# Altium PCB Octo-Electrode.PcbDoc (part 1 of 6)
Units mm, origin at the board's own origin, x right, y up, seen from the top; angles counter-clockwise.
Board outline 202.91 x 135.89 mm, 2 copper layers (Top Layer, Bottom Layer); 289 components, 165 nets, 790 pads, 510 vias.
Unrouted connection lines stored in the file: 83.
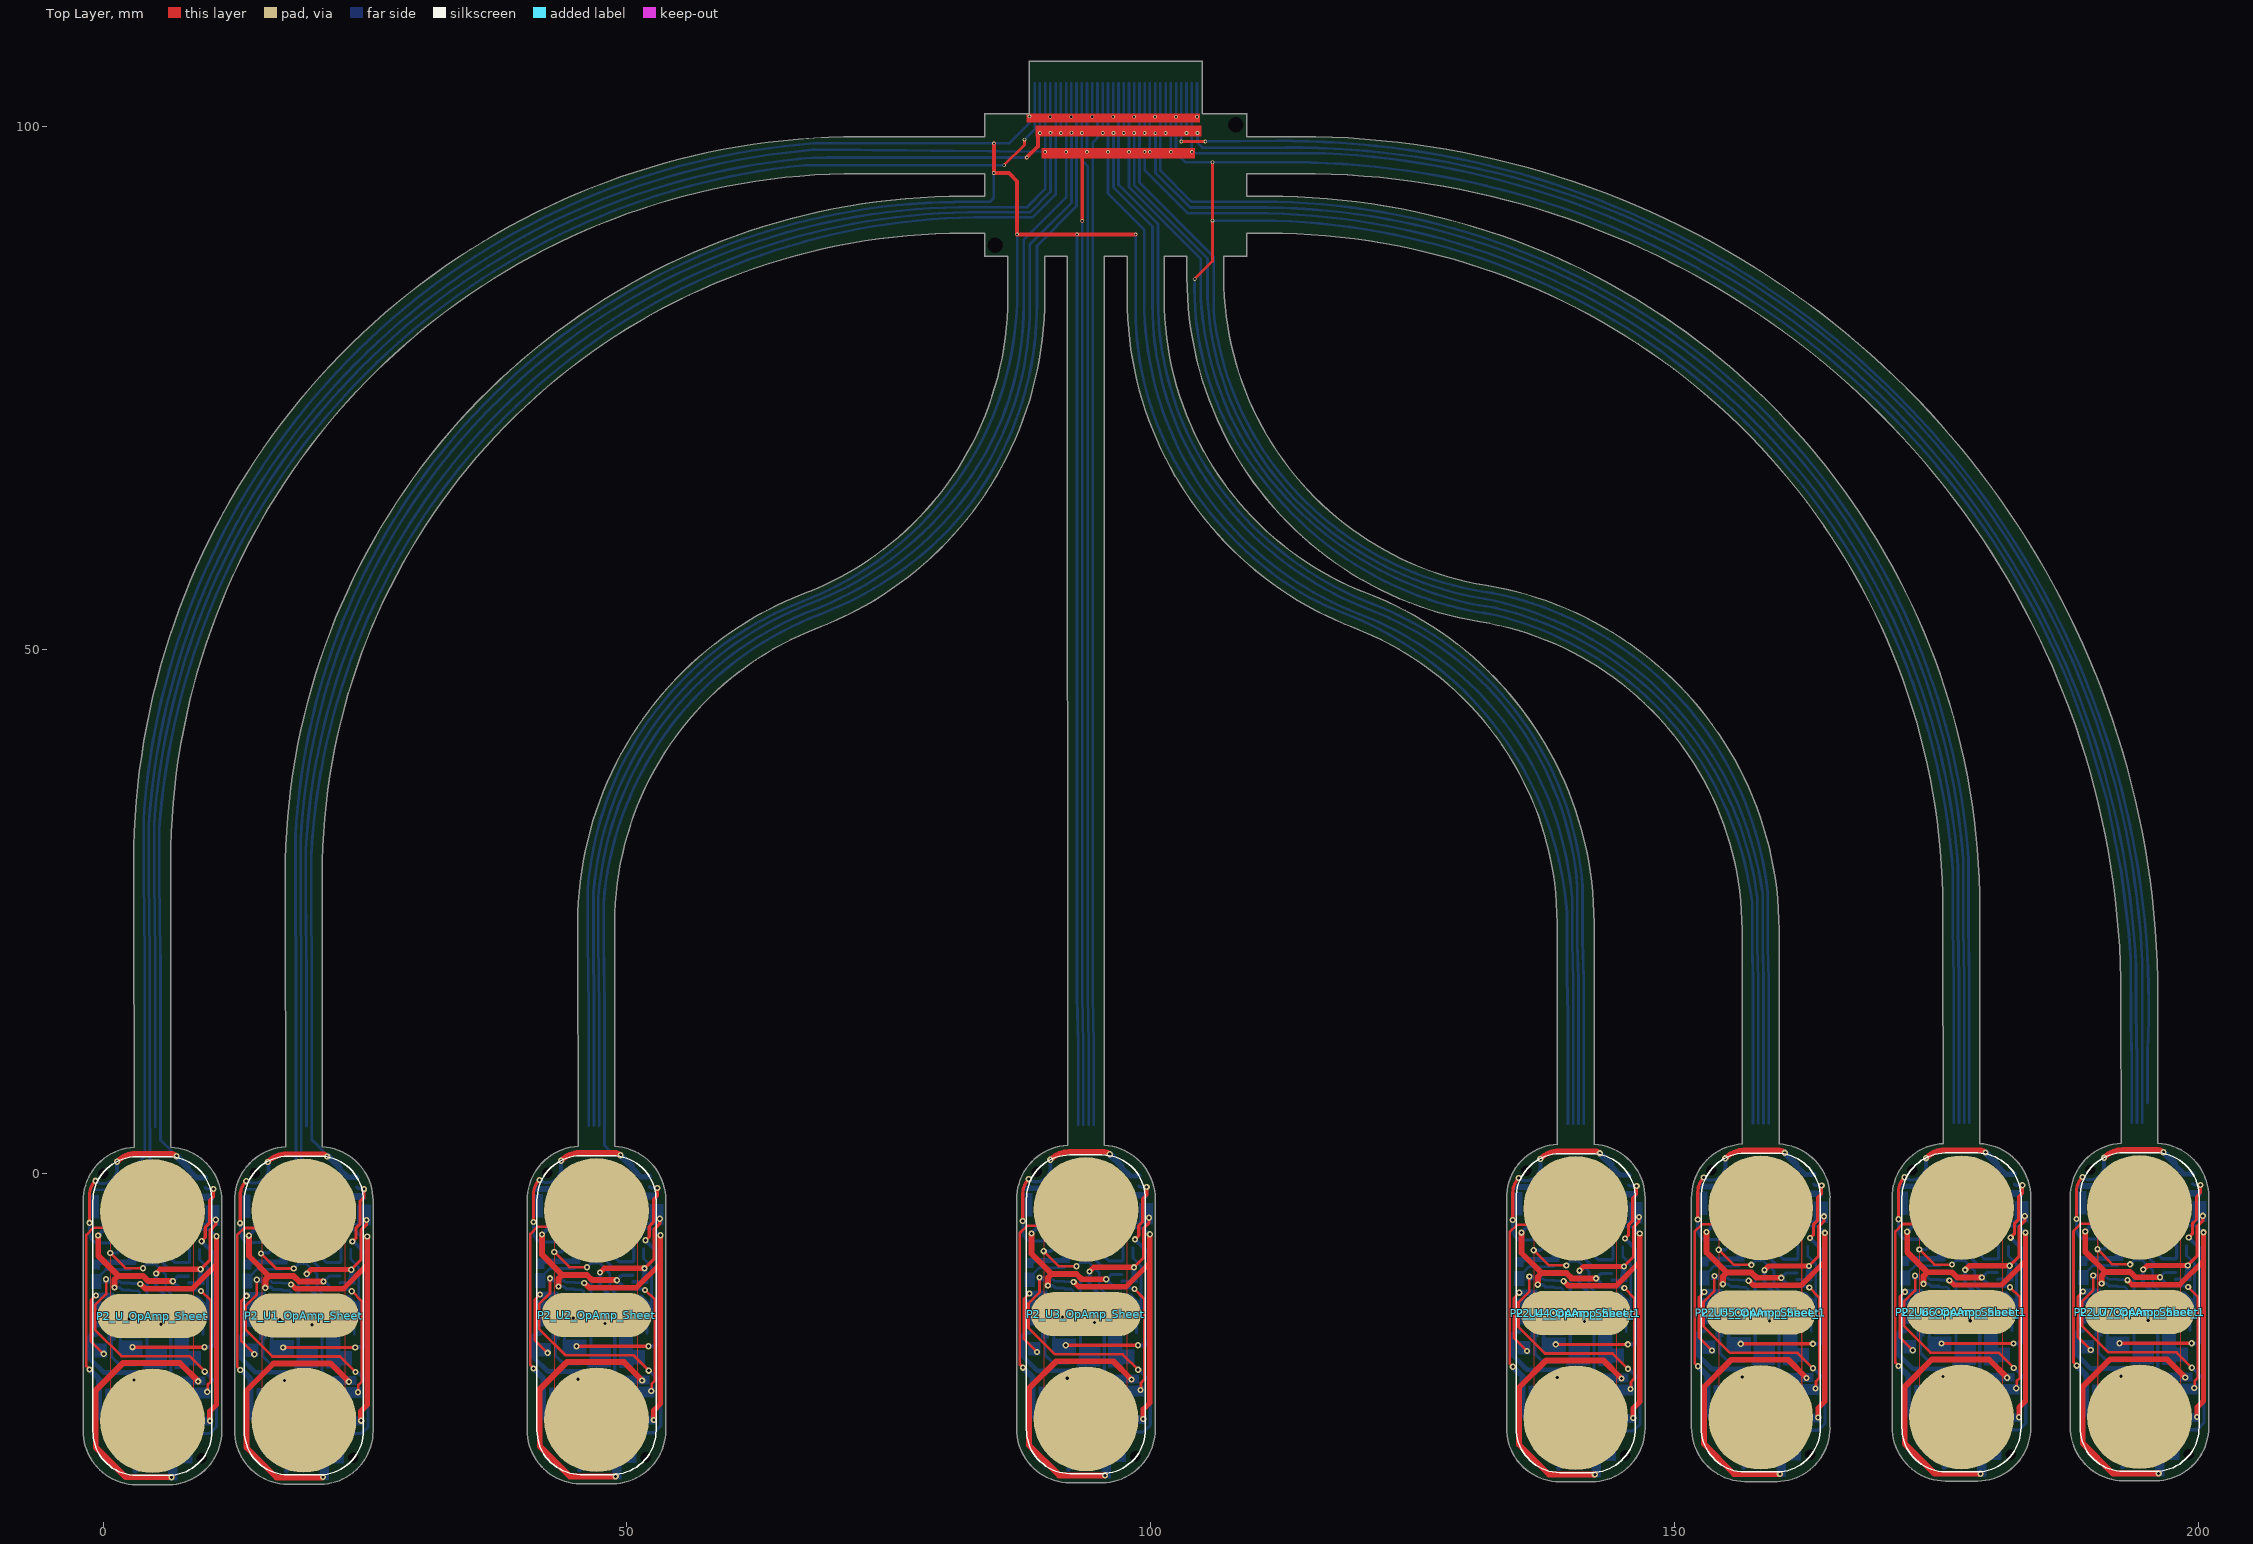
[diagram p0: Top Layer view]
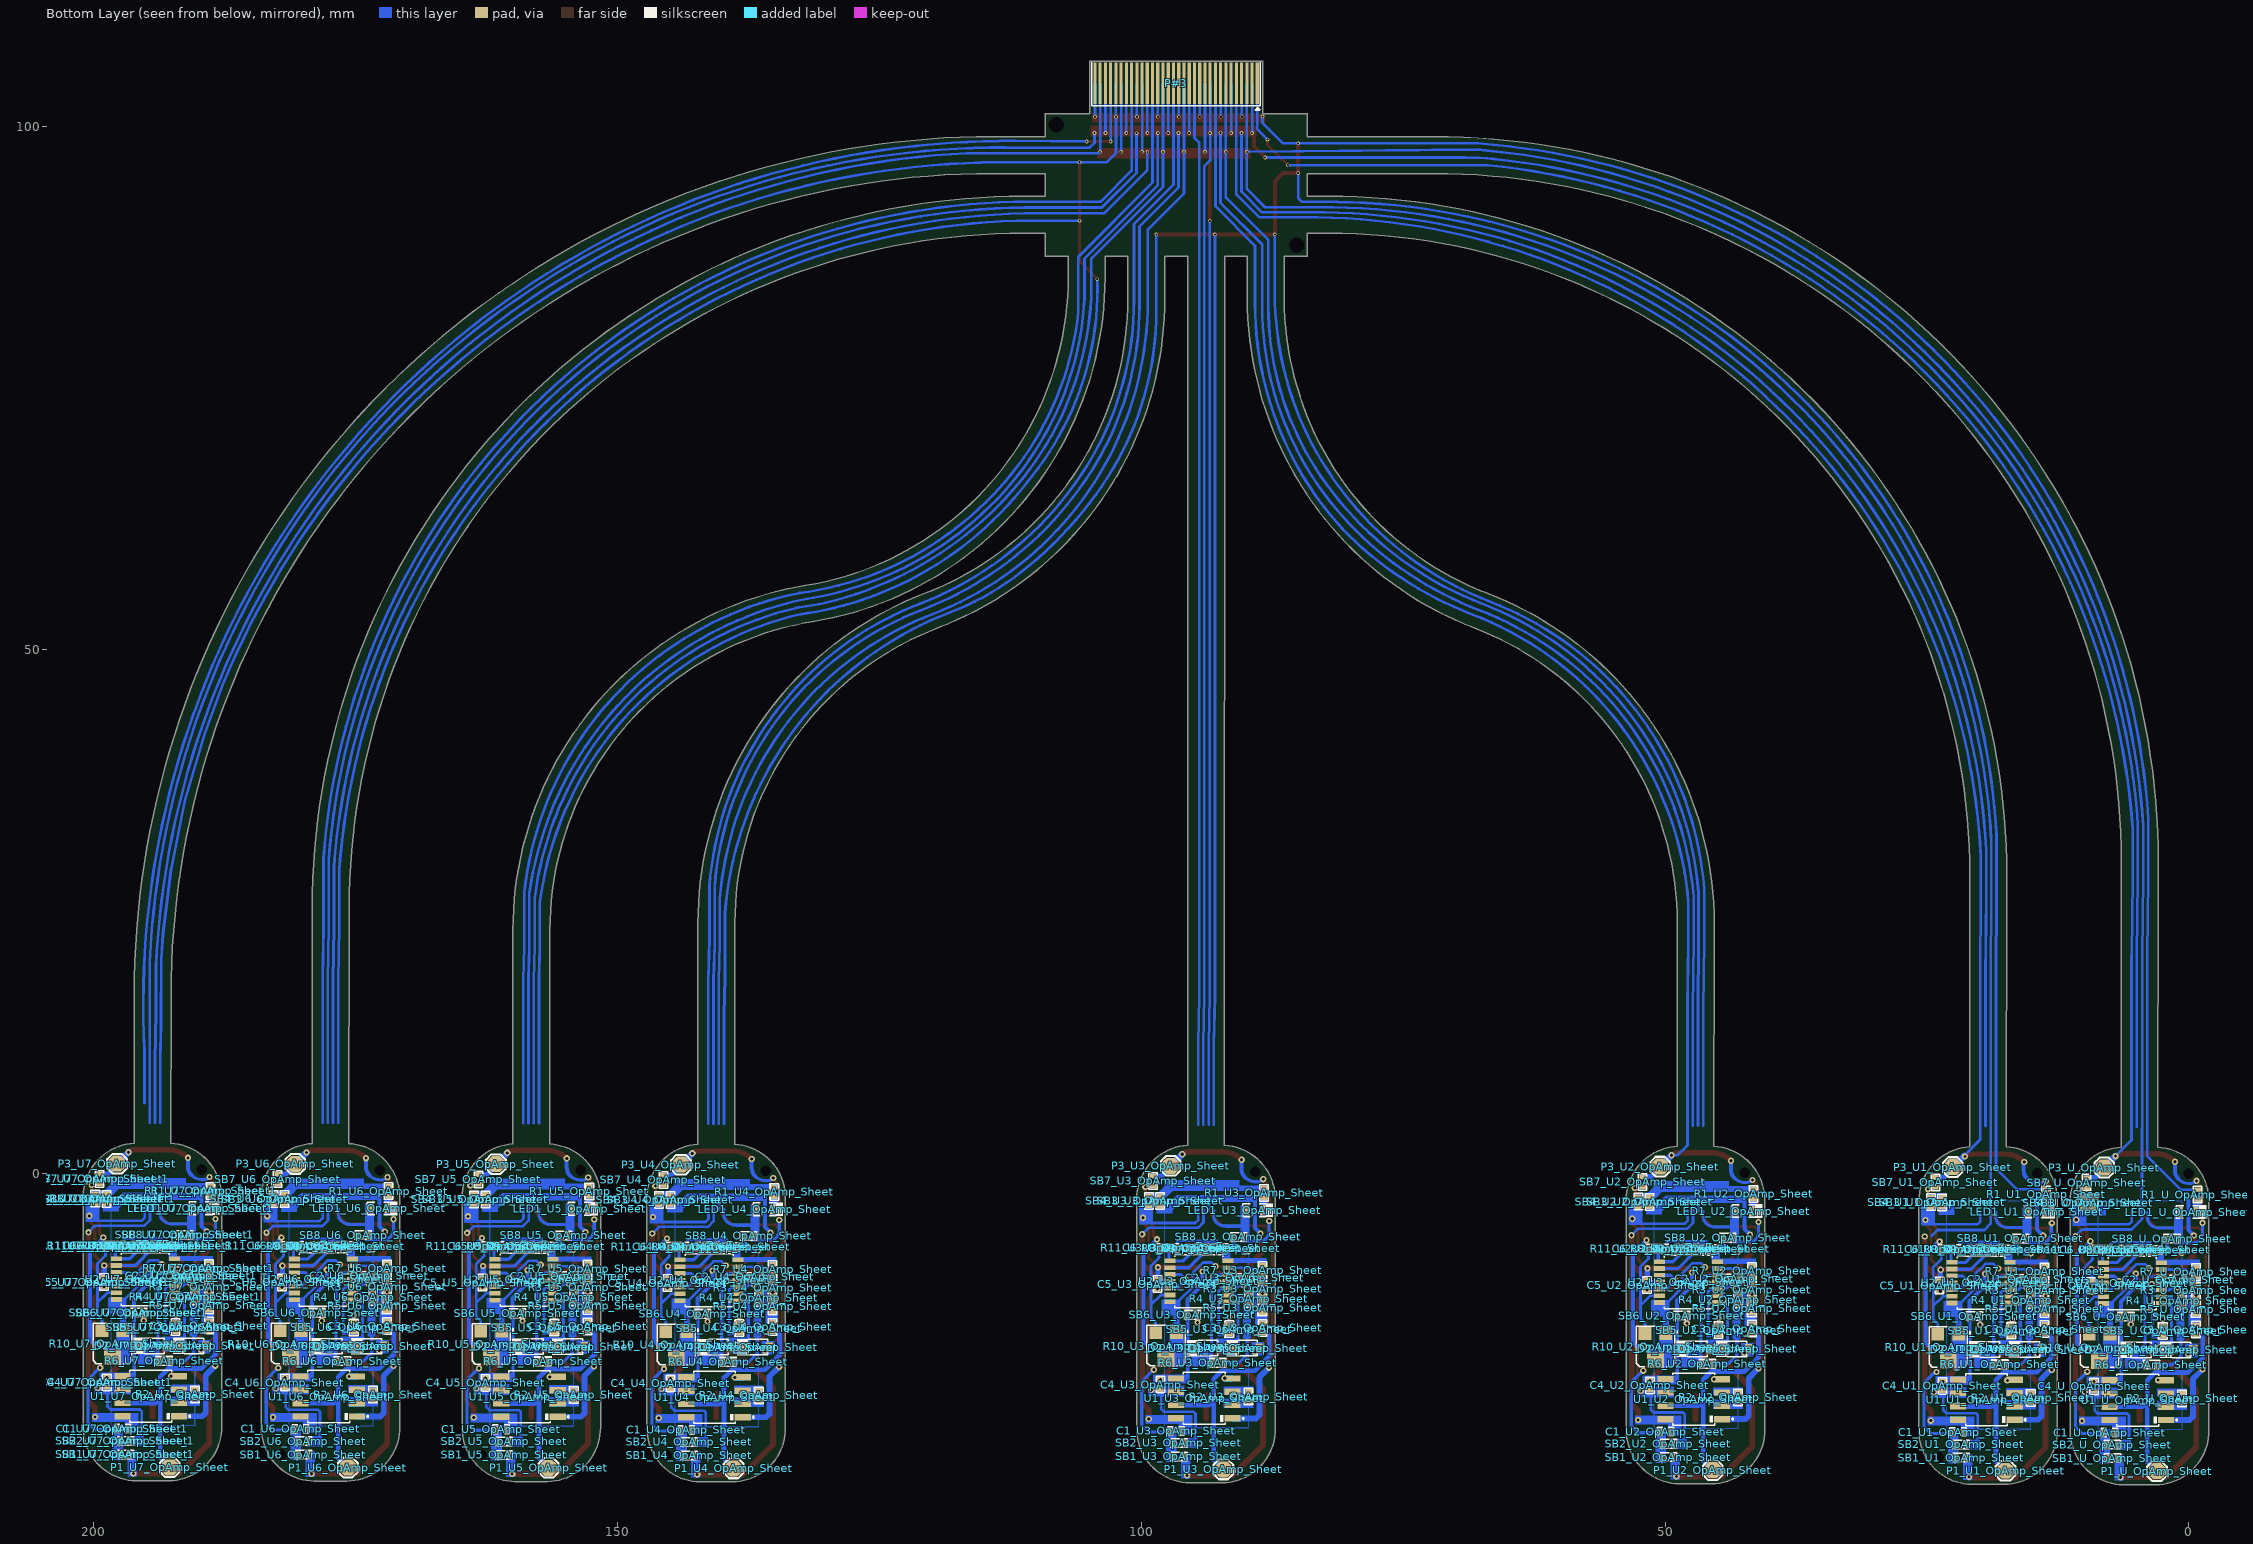
[diagram p1: Bottom Layer view, seen from below]
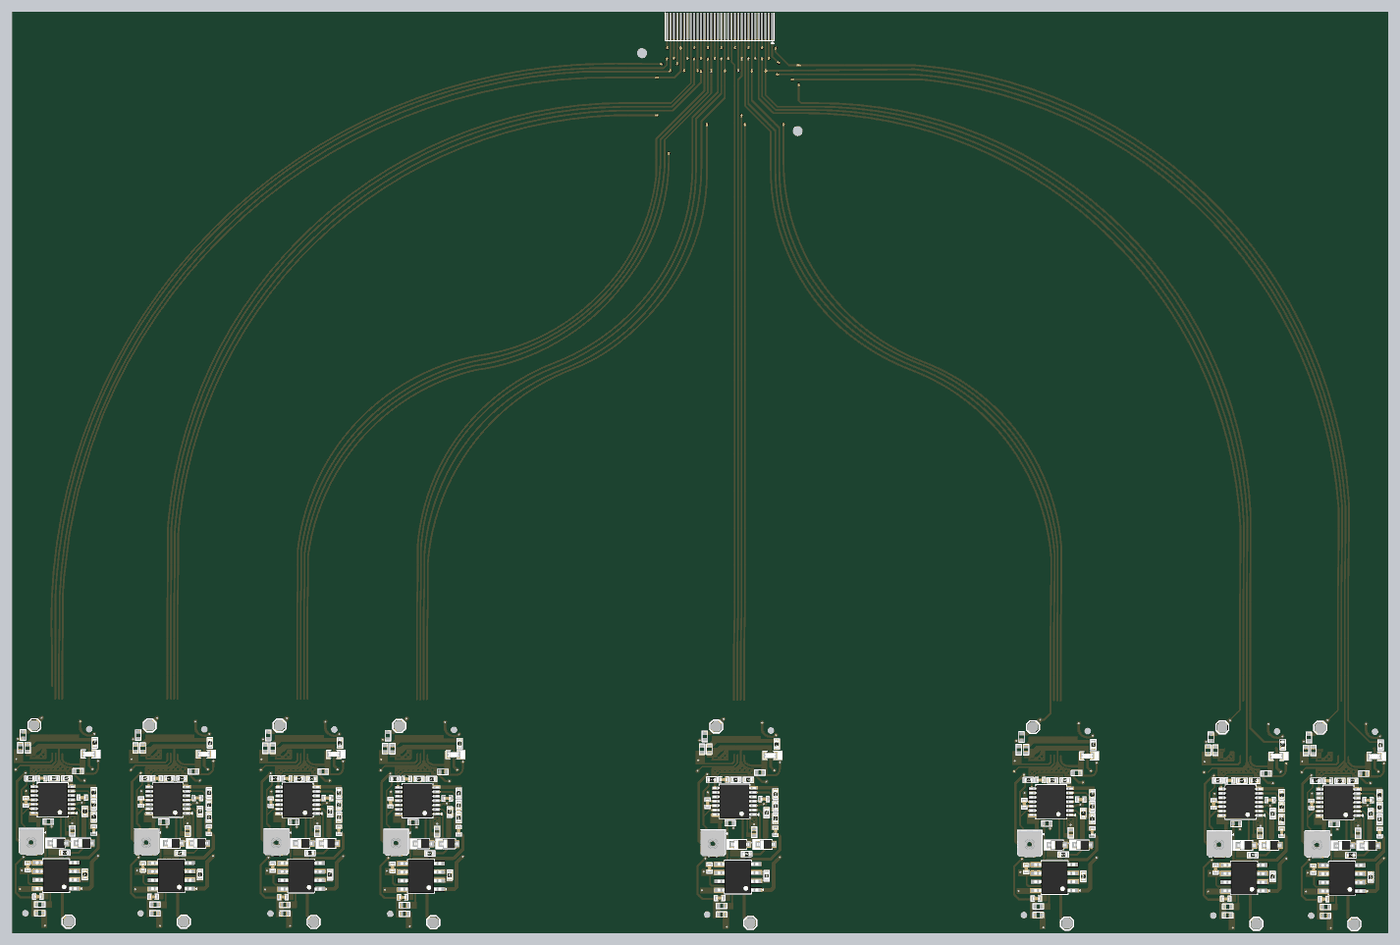
[diagram p6: 3D render of the assembled board from below, using the file's embedded part models]

## Layer stack, top to bottom
Top Solder: solder mask 0.0102, Solder Resist, Dk 3.5
Top Layer: signal copper 0.0356
Dielectric 1: dielectric 0.32, FR-4, Dk 4.8
Bottom Layer: signal copper 0.0356
Bottom Solder: solder mask 0.0102, Solder Resist, Dk 3.5

## Board outline
3.164,-29.694 ccw(c3.166,-29.575) 3.166,-29.694 6.245,-29.694 ccw(c6.245,-29.567) 6.246,-29.694 ccw(c6.189,-24.567) 11.316,-24.567 ccw(c6.189,-24.567) 11.316,-24.51 ccw(c4.059,-24.591) 11.316,-24.51 11.316,-24.511 11.316,-2.649 ccw(c6.188,-2.592) 11.316,-2.592 ccw(c6.189,-2.592) 6.445,2.529 6.445,29.757 cw(c72.162,29.758) 72.163,95.475 84.15,95.475 84.15,93.302 82.163,93.302 ccw(c82.163,28.514) 17.375,28.514 17.414,2.557 ccw(c17.674,-2.563) 12.547,-2.62 ccw(c12.623,-2.62) 12.547,-2.621 12.547,-2.62 12.547,-24.482 cw(c19.804,-24.562) 12.547,-24.481 12.547,-24.482 ccw(c17.674,-24.538) 17.616,-29.665 ccw(c17.618,-29.545) 17.618,-29.665 20.697,-29.665 ccw(c20.697,-29.538) 20.699,-29.665 ccw(c20.641,-24.538) 25.768,-24.538 ccw(c20.641,-24.538) 25.768,-24.482 ccw(c25.765,-24.481) 25.768,-24.481 25.768,-24.482 25.768,-2.62 ccw(c20.641,-2.563) 25.768,-2.563 ccw(c20.641,-2.563) 20.901,2.557 20.901,28.513 cw(c82.162,28.514) 82.163,89.775 84.15,89.775 84.157,87.582 ccw(c84.163,87.582) 84.163,87.575 86.35,87.575 86.35,83.589 cw(c56.158,83.59) 66.962,55.397 ccw(c79.027,23.912) 45.31,23.912 45.347,2.613 ccw(c45.608,-2.508) 40.481,-2.564 ccw(c40.558,-2.564) 40.481,-2.565 40.481,-2.564 40.481,-24.426 ccw(c45.608,-24.483) 45.55,-29.61 ccw(c45.552,-29.49) 45.552,-29.61 48.631,-29.61 ccw(c48.631,-29.482) 48.633,-29.61 ccw(c48.575,-24.483) 53.702,-24.483 ccw(c48.575,-24.483) 53.702,-24.426 ccw(c53.7,-24.425) 53.702,-24.425 53.702,-24.426 53.702,-2.564 ccw(c48.575,-2.508) 53.702,-2.508 ccw(c48.575,-2.508) 48.836,2.613 48.836,23.912 cw(c79.028,23.911) 68.224,52.104 ccw(c56.159,83.588) 89.876,83.588 ccw(c89.876,83.589) 89.876,83.589 89.876,87.575 92.05,87.575 92.057,2.706 ccw(c92.333,-2.414) 87.206,-2.471 ccw(c87.283,-2.471) 87.206,-2.472 87.206,-2.47 87.206,-24.332 cw(c94.463,-24.413) 87.206,-24.332 ccw(c92.333,-24.389) 92.275,-29.516 ccw(c92.277,-29.396) 92.277,-29.516 95.356,-29.516 ccw(c95.356,-29.389) 95.358,-29.516 ccw(c95.3,-24.389) 100.427,-24.389 ccw(c95.3,-24.389) 100.427,-24.332 ccw(c100.424,-24.332) 100.427,-24.332 100.427,-24.333 100.427,-2.471 ccw(c95.3,-2.414) 100.427,-2.414 ccw(c95.3,-2.414) 95.576,2.706 95.576,87.575 97.75,87.575 97.75,83.589 ccw(c131.467,83.588) 119.402,52.104 cw(c108.598,23.911) 138.79,23.912 138.827,2.8 ccw(c139.088,-2.321) 133.961,-2.378 ccw(c134.038,-2.377) 133.961,-2.379 133.961,-2.377 133.961,-24.239 cw(c141.218,-24.32) 133.961,-24.238 133.961,-24.239 ccw(c139.088,-24.296) 139.03,-29.423 ccw(c139.032,-29.303) 139.032,-29.423 142.111,-29.423 ccw(c142.111,-29.296) 142.113,-29.423 ccw(c142.055,-24.296) 147.182,-24.296 ccw(c142.055,-24.296) 147.182,-24.239 ccw(c147.179,-24.239) 147.182,-24.238 147.182,-24.24 147.182,-2.378 ccw(c142.055,-2.321) 147.182,-2.321 ccw(c142.055,-2.321) 142.316,2.8 142.316,23.912 ccw(c142.316,23.912) 142.316,23.912 ccw(c108.599,23.912) 120.664,55.397 cw(c131.468,83.59) 101.276,83.589 101.276,87.575 103.45,87.575 103.45,85.589 ccw(c136.785,85.588) 131.429,52.685 cw(c126.64,23.263) 156.45,23.263 cw(c156.449,23.262) 156.45,23.262 156.485,2.835 ccw(c156.747,-2.286) 151.62,-2.343 ccw(c151.697,-2.342) 151.62,-2.343 151.62,-2.342 151.62,-24.204 cw(c158.877,-24.284) 151.62,-24.203 151.62,-24.204 ccw(c156.747,-24.261) 156.69,-29.388 ccw(c156.691,-29.268) 156.691,-29.388 159.771,-29.388 ccw(c159.771,-29.26) 159.772,-29.388 ccw(c159.714,-24.261) 164.842,-24.261 ccw(c159.714,-24.261) 164.841,-24.204 ccw(c164.839,-24.204) 164.841,-24.203 164.841,-24.205 164.841,-2.343 ccw(c159.714,-2.286) 164.842,-2.286 ccw(c159.714,-2.286) 159.976,2.835 159.976,23.262 ccw(c159.971,23.262) 159.976,23.263 ccw(c126.64,23.263) 131.996,56.166 cw(c136.788,85.59) 106.976,85.589 106.976,87.575 109.169,87.582 ccw(c109.169,87.589) 109.176,87.589 109.176,89.775 111.163,89.775 cw(c111.163,25.33) 175.608,25.33 175.647,2.873 ccw(c175.908,-2.247) 170.781,-2.304 ccw(c170.857,-2.304) 170.781,-2.305 170.781,-2.304 170.781,-24.166 cw(c178.037,-24.246) 170.781,-24.165 170.781,-24.166 ccw(c175.908,-24.222) 175.85,-29.35 ccw(c175.852,-29.229) 175.851,-29.35 178.931,-29.35 ccw(c178.931,-29.222) 178.932,-29.35 ccw(c178.875,-24.222) 184.002,-24.222 ccw(c178.875,-24.222) 184.002,-24.166 ccw(c183.999,-24.165) 184.002,-24.165 184.002,-24.166 184.002,-2.304 ccw(c178.874,-2.247) 184.002,-2.247 ccw(c178.875,-2.247) 179.135,2.873 179.135,25.33 ccw(c111.163,25.33) 111.163,93.302 109.176,93.302 109.176,95.475 114.163,95.475 cw(c114.162,17.023) 192.614,17.025 192.638,2.907 ccw(c192.906,-2.214) 187.779,-2.27 ccw(c187.856,-2.27) 187.779,-2.271 187.779,-2.27 187.779,-24.132 cw(c195.036,-24.212) 187.779,-24.131 187.779,-24.132 ccw(c192.906,-24.189) 192.849,-29.316 ccw(c192.85,-29.195) 192.85,-29.316 195.93,-29.316 ccw(c195.93,-29.188) 195.931,-29.316 ccw(c195.873,-24.189) 201.001,-24.189 ccw(c195.873,-24.189) 201,-24.132 ccw(c200.998,-24.131) 201,-24.131 201,-24.132 201,-2.27 ccw(c195.873,-2.214) 201.001,-2.214 ccw(c195.873,-2.214) 196.141,2.907 196.141,17.025 ccw(c114.164,17.025) 114.163,99.002 109.176,99.002 109.17,101.195 ccw(c109.163,101.195) 109.163,101.202 104.921,101.202 104.921,106.187 ccw(c104.914,106.189) 104.921,106.189 ccw(c104.914,106.189) 104.914,106.196 88.411,106.196 ccw(c88.411,106.189) 88.405,106.187 88.405,101.202 87.956,101.202 84.156,101.196 ccw(c84.156,101.189) 84.15,101.189 84.15,99.002 72.163,99.002 ccw(c72.163,29.756) 2.918,29.757 2.965,2.529 ccw(c3.222,-2.592) -1.905,-2.649 ccw(c-1.829,-2.649) -1.905,-2.65 -1.905,-2.648 -1.905,-24.51 cw(c5.352,-24.591) -1.905,-24.51 ccw(c3.222,-24.567)
board region Electrode#8: 6.445,2.539 6.445,2.529 6.77,2.512 7.411,2.398 8.032,2.204 8.623,1.932 9.175,1.588 9.68,1.177 10.128,0.706 10.513,0.182 10.829,-0.387 11.071,-0.992 11.234,-1.621 11.316,-2.267 11.316,-2.592 11.316,-2.614 11.316,-2.628 11.316,-2.642 11.316,-24.511 11.316,-24.532 11.316,-24.546 11.316,-24.56 11.316,-24.901 11.23,-25.563 11.058,-26.207 10.805,-26.825 10.473,-27.404 10.069,-27.935 9.6,-28.41 9.073,-28.819 8.498,-29.157 7.884,-29.418 7.241,-29.597 6.58,-29.691 6.246,-29.694 3.166,-29.694 2.828,-29.691 2.163,-29.595 1.516,-29.414 0.898,-29.15 0.319,-28.807 -0.209,-28.392 -0.679,-27.912 -1.082,-27.374 -1.412,-26.788 -1.662,-26.165 -1.829,-25.514 -1.909,-24.846 -1.905,-24.51 -1.905,-2.648 -1.909,-2.321 -1.833,-1.67 -1.674,-1.034 -1.436,-0.424 -1.122,0.151 -0.737,0.682 -0.288,1.16 0.218,1.576 0.773,1.924 1.368,2.199 1.993,2.396 2.638,2.512 2.965,2.529 2.965,2.539
board region Electrode#6: 48.836,2.615 48.836,2.613 49.161,2.597 49.801,2.482 50.421,2.287 51.012,2.015 51.564,1.671 52.068,1.26 52.516,0.789 52.901,0.265 53.216,-0.304 53.457,-0.908 53.62,-1.537 53.703,-2.182 53.703,-2.508 53.702,-2.529 53.702,-2.543 53.702,-2.557 53.702,-24.426 53.702,-24.447 53.702,-24.461 53.703,-24.476 53.703,-24.816 53.616,-25.478 53.445,-26.123 53.191,-26.74 52.859,-27.319 52.456,-27.851 51.986,-28.325 51.46,-28.735 50.884,-29.073 50.27,-29.333 49.627,-29.512 48.966,-29.606 48.633,-29.61 45.552,-29.61 45.214,-29.606 44.549,-29.511 43.902,-29.329 43.284,-29.065 42.706,-28.723 42.177,-28.308 41.707,-27.827 41.304,-27.29 40.975,-26.704 40.724,-26.08 40.558,-25.429 40.477,-24.762 40.481,-24.426 40.481,-2.564 40.477,-2.237 40.554,-1.586 40.712,-0.951 40.95,-0.34 41.263,0.235 41.647,0.765 42.096,1.242 42.602,1.659 43.156,2.007 43.751,2.283 44.375,2.48 45.02,2.596 45.347,2.613 45.347,2.615
board region Electrod#7: 20.901,2.564 20.901,2.557 21.226,2.541 21.866,2.426 22.487,2.231 23.077,1.96 23.629,1.616 24.133,1.205 24.581,0.733 24.966,0.209 25.282,-0.36 25.523,-0.963 25.686,-1.593 25.768,-2.238 25.768,-2.563 25.768,-2.585 25.768,-2.599 25.768,-2.613 25.768,-24.482 25.768,-24.503 25.768,-24.517 25.768,-24.531 25.768,-24.872 25.682,-25.534 25.51,-26.179 25.257,-26.796 24.925,-27.375 24.521,-27.906 24.052,-28.381 23.526,-28.791 22.95,-29.128 22.336,-29.389 21.693,-29.568 21.032,-29.662 20.699,-29.665 17.618,-29.665 17.28,-29.662 16.615,-29.566 15.968,-29.385 15.35,-29.121 14.772,-28.779 14.243,-28.364 13.773,-27.883 13.37,-27.345 13.04,-26.76 12.79,-26.136 12.623,-25.485 12.543,-24.818 12.547,-24.482 12.547,-2.62 12.543,-2.293 12.619,-1.642 12.778,-1.006 13.016,-0.396 13.329,0.179 13.714,0.71 14.162,1.187 14.668,1.603 15.223,1.952 15.817,2.227 16.442,2.425 17.086,2.541 17.414,2.557 17.414,2.564
board region Electrode#5: 95.576,2.716 95.576,2.706 95.9,2.688 96.539,2.572 97.157,2.376 97.746,2.103 98.296,1.759 98.799,1.348 99.245,0.877 99.629,0.353 99.943,-0.215 100.183,-0.818 100.345,-1.446 100.427,-2.09 100.427,-2.414 100.427,-2.436 100.427,-2.45 100.427,-2.464 100.427,-24.333 100.427,-24.354 100.427,-24.368 100.427,-24.382 100.427,-24.723 100.341,-25.385 100.169,-26.03 99.916,-26.647 99.584,-27.226 99.18,-27.757 98.711,-28.232 98.184,-28.641 97.609,-28.979 96.995,-29.24 96.352,-29.419 95.691,-29.513 95.358,-29.516 92.277,-29.516 91.939,-29.513 91.274,-29.417 90.627,-29.236 90.009,-28.972 89.431,-28.63 88.902,-28.214 88.432,-27.734 88.029,-27.196 87.699,-26.611 87.449,-25.987 87.282,-25.336 87.202,-24.668 87.206,-24.332 87.206,-2.47 87.202,-2.144 87.278,-1.495 87.436,-0.86 87.673,-0.251 87.985,0.323 88.368,0.853 88.815,1.33 89.319,1.747 89.872,2.096 90.464,2.372 91.087,2.57 91.73,2.688 92.057,2.706 92.057,2.716
board region Electrode#2: 179.222,2.869 179.46,2.857 180.1,2.742 180.72,2.547 181.311,2.276 181.863,1.932 182.367,1.521 182.815,1.049 183.2,0.525 183.516,-0.044 183.757,-0.648 183.92,-1.277 184.002,-1.922 184.002,-2.247 184.002,-2.269 184.002,-2.283 184.002,-2.297 184.002,-24.166 184.002,-24.187 184.002,-24.201 184.002,-24.215 184.002,-24.556 183.916,-25.218 183.744,-25.863 183.49,-26.48 183.159,-27.059 182.755,-27.59 182.286,-28.065 181.759,-28.475 181.184,-28.813 180.569,-29.073 179.927,-29.252 179.266,-29.346 178.932,-29.35 175.851,-29.35 175.514,-29.346 174.849,-29.251 174.202,-29.069 173.584,-28.805 173.005,-28.463 172.477,-28.048 172.007,-27.567 171.604,-27.029 171.274,-26.444 171.024,-25.82 170.857,-25.169 170.777,-24.502 170.781,-24.166 170.781,-2.304 170.777,-1.977 170.853,-1.326 171.011,-0.691 171.249,-0.08 171.563,0.495 171.947,1.025 172.396,1.503 172.902,1.919 173.456,2.268 174.051,2.543 174.675,2.74 175.32,2.857 175.56,2.869
board region Electrode#4: 142.452,2.793 142.641,2.783 143.281,2.668 143.901,2.473 144.492,2.202 145.044,1.858 145.548,1.447 145.996,0.975 146.381,0.451 146.696,-0.117 146.937,-0.721 147.1,-1.351 147.182,-1.996 147.182,-2.321 147.182,-2.342 147.182,-2.356 147.182,-2.371 147.182,-24.24 147.182,-24.26 147.182,-24.275 147.182,-24.289 147.182,-24.63 147.096,-25.291 146.924,-25.936 146.671,-26.553 146.339,-27.133 145.935,-27.664 145.466,-28.138 144.94,-28.548 144.364,-28.886 143.75,-29.147 143.107,-29.325 142.446,-29.419 142.113,-29.423 139.032,-29.423 138.694,-29.419 138.029,-29.324 137.382,-29.143 136.764,-28.879 136.186,-28.536 135.657,-28.121 135.187,-27.641 134.784,-27.103 134.454,-26.517 134.204,-25.893 134.037,-25.242 133.957,-24.575 133.961,-24.239 133.961,-2.377 133.957,-2.05 134.033,-1.4 134.192,-0.764 134.429,-0.154 134.743,0.421 135.127,0.952 135.576,1.429 136.081,1.845 136.636,2.194 137.23,2.469 137.855,2.667 138.499,2.783 138.684,2.792
board region Electrode#3: 159.976,2.843 159.976,2.835 160.301,2.818 160.941,2.703 161.561,2.509 162.152,2.237 162.704,1.893 163.207,1.482 163.655,1.01 164.04,0.486 164.356,-0.082 164.597,-0.686 164.76,-1.316 164.842,-1.961 164.842,-2.286 164.842,-2.307 164.842,-2.321 164.842,-2.335 164.841,-24.205 164.842,-24.225 164.842,-24.239 164.842,-24.254 164.842,-24.594 164.755,-25.256 164.584,-25.901 164.33,-26.518 163.999,-27.097 163.595,-27.629 163.126,-28.103 162.599,-28.513 162.024,-28.851 161.409,-29.111 160.766,-29.29 160.106,-29.384 159.772,-29.388 156.691,-29.388 156.354,-29.384 155.688,-29.289 155.041,-29.108 154.423,-28.843 153.845,-28.501 153.316,-28.086 152.847,-27.605 152.443,-27.068 152.114,-26.482 151.864,-25.858 151.697,-25.207 151.617,-24.54 151.62,-24.204 151.62,-2.342 151.617,-2.015 151.693,-1.365 151.851,-0.729 152.089,-0.119 152.402,0.456 152.787,0.987 153.235,1.464 153.741,1.88 154.295,2.229 154.889,2.504 155.514,2.702 156.158,2.818 156.485,2.835 156.485,2.843
board region "Octopus Cable": 724 vertices, not listed, extent 2.918,2.539 196.141,106.196
board region Electrode#1: 196.141,2.922 196.141,2.907 196.466,2.89 197.105,2.774 197.725,2.579 198.315,2.307 198.866,1.963 199.369,1.552 199.816,1.081 200.2,0.557 200.515,-0.012 200.756,-0.615 200.919,-1.244 201.001,-1.889 201.001,-2.214 201.001,-2.235 201.001,-2.249 201.001,-2.263 201,-24.132 201.001,-24.153 201.001,-24.167 201.001,-24.181 201.001,-24.522 200.914,-25.184 200.743,-25.829 200.489,-26.446 200.158,-27.025 199.754,-27.556 199.285,-28.031 198.758,-28.441 198.183,-28.779 197.568,-29.039 196.925,-29.218 196.265,-29.312 195.931,-29.316 192.85,-29.316 192.513,-29.312 191.847,-29.217 191.2,-29.035 190.582,-28.771 190.004,-28.429 189.475,-28.014 189.006,-27.533 188.602,-26.995 188.273,-26.41 188.023,-25.786 187.856,-25.135 187.776,-24.468 187.779,-24.132 187.779,-2.27 187.776,-1.943 187.852,-1.293 188.01,-0.658 188.247,-0.048 188.56,0.527 188.944,1.057 189.392,1.534 189.897,1.95 190.45,2.299 191.044,2.575 191.668,2.773 192.312,2.89 192.388,2.894

## Design rules (kind name [scope] priority, off if disabled: settings)
Clearance [All] p1: gap=0.254 ignorepadtopadclearanceinfootprint=FALSE except(0: Arc-Hole Track-Hole SMDPad-Hole THPad-Hole Via-Hole Fill-Hole Poly-Hole Region-Hole Text-Hole)
DiffPairsRouting [All] p1: maxlimit=0.254 minlimit=0.254 mostfreqgap=0.254 toplayer_minwidth=0.381 toplayer_maxwidth=0.381 toplayer_prefwidth=0.381 bottomlayer_minwidth=0.381 bottomlayer_maxwidth=0.381 bottomlayer_prefwidth=0.381 substack1={5F1B2639-0814-40D6-A899-AA88A4E8CB33} toplayer_{5f1b2639-0814-40d6-a899-aa88a4e8cb33}_minwidth=0.381 toplayer_{5f1b2639-0814-40d6-a899-aa88a4e8cb33}_maxwidth=0.381 toplayer_{5f1b2639-0814-40d6-a899-aa88a4e8cb33}_prefwidth=0.381 bottomlayer_{5f1b2639-0814-40d6-a899-aa88a4e8cb33}_minwidth=0.381 bottomlayer_{5f1b2639-0814-40d6-a899-aa88a4e8cb33}_maxwidth=0.381 bottomlayer_{5f1b2639-0814-40d6-a899-aa88a4e8cb33}_prefwidth=0.381 maxuncoupledlength=12.7
PolygonConnect [All] p1: connectstyle=Relief reliefconductorwidth=0.254 reliefentries=4 polygonreliefangle="90 Angle" airgapwidth=0.254
RoutingVias [All] p1: holewidth=0.711 width=1.27 viastyle="Through Hole" minholewidth=0.711 minwidth=1.27 maxholewidth=0.711 maxwidth=1.27
SolderMaskExpansion [All] p1: expansion=0.102 istentingtop=FALSE
Width [All] p1: maxlimit=0.254 minlimit=0.254 preferedwidth=0.254 substack1={5F1B2639-0814-40D6-A899-AA88A4E8CB33}
29 further rules are at their usual default settings.

## Classes and differential pairs
channel class OpAmp_Sheet: U1_OpAmp_Sheet U2_OpAmp_Sheet U3_OpAmp_Sheet U4_OpAmp_Sheet U5_OpAmp_Sheet U6_OpAmp_Sheet U7_OpAmp_Sheet U_OpAmp_Sheet
component class U_OpAmp_Sheet: C1_U_OpAmp_Sheet C2_U_OpAmp_Sheet C3_U_OpAmp_Sheet C4_U_OpAmp_Sheet C5_U_OpAmp_Sheet C6_U_OpAmp_Sheet D1_U_OpAmp_Sheet D2_U_OpAmp_Sheet LED1_U_OpAmp_Sheet P1_U_OpAmp_Sheet P2_U_OpAmp_Sheet P3_U_OpAmp_Sheet R1_U_OpAmp_Sheet R2_U_OpAmp_Sheet R3_U_OpAmp_Sheet R4_U_OpAmp_Sheet R5_U_OpAmp_Sheet R6_U_OpAmp_Sheet R7_U_OpAmp_Sheet R8_U_OpAmp_Sheet R9_U_OpAmp_Sheet R10_U_OpAmp_Sheet R11_U_OpAmp_Sheet SB1_U_OpAmp_Sheet SB2_U_OpAmp_Sheet SB3_U_OpAmp_Sheet SB4_U_OpAmp_Sheet SB5_U_OpAmp_Sheet SB6_U_OpAmp_Sheet SB7_U_OpAmp_Sheet SB8_U_OpAmp_Sheet U1_U_OpAmp_Sheet U2_U_OpAmp_Sheet
component class U7_OpAmp_Sheet: C1_U7_OpAmp_Sheet C2_U7_OpAmp_Sheet C3_U7_OpAmp_Sheet C4_U7_OpAmp_Sheet C5_U7_OpAmp_Sheet C6_U7_OpAmp_Sheet D1_U7_OpAmp_Sheet D2_U7_OpAmp_Sheet LED1_U7_OpAmp_Sheet P1_U7_OpAmp_Sheet P2_U7_OpAmp_Sheet R1_U7_OpAmp_Sheet R2_U7_OpAmp_Sheet R3_U7_OpAmp_Sheet R4_U7_OpAmp_Sheet R5_U7_OpAmp_Sheet R6_U7_OpAmp_Sheet R7_U7_OpAmp_Sheet R8_U7_OpAmp_Sheet R9_U7_OpAmp_Sheet R10_U7_OpAmp_Sheet R11_U7_OpAmp_Sheet SB1_U7_OpAmp_Sheet SB2_U7_OpAmp_Sheet SB3_U7_OpAmp_Sheet SB4_U7_OpAmp_Sheet SB5_U7_OpAmp_Sheet SB6_U7_OpAmp_Sheet SB7_U7_OpAmp_Sheet SB8_U7_OpAmp_Sheet U1_U7_OpAmp_Sheet U2_U7_OpAmp_Sheet
component class U6_OpAmp_Sheet: C1_U6_OpAmp_Sheet C2_U6_OpAmp_Sheet C3_U6_OpAmp_Sheet C4_U6_OpAmp_Sheet C5_U6_OpAmp_Sheet C6_U6_OpAmp_Sheet D1_U6_OpAmp_Sheet D2_U6_OpAmp_Sheet LED1_U6_OpAmp_Sheet P1_U6_OpAmp_Sheet P2_U6_OpAmp_Sheet P3_U6_OpAmp_Sheet R1_U6_OpAmp_Sheet R2_U6_OpAmp_Sheet R3_U6_OpAmp_Sheet R4_U6_OpAmp_Sheet R5_U6_OpAmp_Sheet R6_U6_OpAmp_Sheet R7_U6_OpAmp_Sheet R8_U6_OpAmp_Sheet R9_U6_OpAmp_Sheet R10_U6_OpAmp_Sheet R11_U6_OpAmp_Sheet SB1_U6_OpAmp_Sheet SB2_U6_OpAmp_Sheet SB3_U6_OpAmp_Sheet SB4_U6_OpAmp_Sheet SB5_U6_OpAmp_Sheet SB6_U6_OpAmp_Sheet SB7_U6_OpAmp_Sheet SB8_U6_OpAmp_Sheet U1_U6_OpAmp_Sheet U2_U6_OpAmp_Sheet
component class U5_OpAmp_Sheet: C1_U5_OpAmp_Sheet C2_U5_OpAmp_Sheet C3_U5_OpAmp_Sheet C4_U5_OpAmp_Sheet C5_U5_OpAmp_Sheet C6_U5_OpAmp_Sheet D1_U5_OpAmp_Sheet D2_U5_OpAmp_Sheet LED1_U5_OpAmp_Sheet P1_U5_OpAmp_Sheet P2_U5_OpAmp_Sheet P3_U5_OpAmp_Sheet R1_U5_OpAmp_Sheet R2_U5_OpAmp_Sheet R3_U5_OpAmp_Sheet R4_U5_OpAmp_Sheet R5_U5_OpAmp_Sheet R6_U5_OpAmp_Sheet R7_U5_OpAmp_Sheet R8_U5_OpAmp_Sheet R9_U5_OpAmp_Sheet R10_U5_OpAmp_Sheet R11_U5_OpAmp_Sheet SB1_U5_OpAmp_Sheet SB2_U5_OpAmp_Sheet SB3_U5_OpAmp_Sheet SB4_U5_OpAmp_Sheet SB5_U5_OpAmp_Sheet SB6_U5_OpAmp_Sheet SB7_U5_OpAmp_Sheet SB8_U5_OpAmp_Sheet U1_U5_OpAmp_Sheet U2_U5_OpAmp_Sheet
component class U4_OpAmp_Sheet: C1_U4_OpAmp_Sheet C2_U4_OpAmp_Sheet C3_U4_OpAmp_Sheet C4_U4_OpAmp_Sheet C5_U4_OpAmp_Sheet C6_U4_OpAmp_Sheet D1_U4_OpAmp_Sheet D2_U4_OpAmp_Sheet LED1_U4_OpAmp_Sheet P1_U4_OpAmp_Sheet P2_U4_OpAmp_Sheet P3_U4_OpAmp_Sheet R1_U4_OpAmp_Sheet R2_U4_OpAmp_Sheet R3_U4_OpAmp_Sheet R4_U4_OpAmp_Sheet R5_U4_OpAmp_Sheet R6_U4_OpAmp_Sheet R7_U4_OpAmp_Sheet R8_U4_OpAmp_Sheet R9_U4_OpAmp_Sheet R10_U4_OpAmp_Sheet R11_U4_OpAmp_Sheet SB1_U4_OpAmp_Sheet SB2_U4_OpAmp_Sheet SB3_U4_OpAmp_Sheet SB4_U4_OpAmp_Sheet SB5_U4_OpAmp_Sheet SB6_U4_OpAmp_Sheet SB7_U4_OpAmp_Sheet SB8_U4_OpAmp_Sheet U1_U4_OpAmp_Sheet U2_U4_OpAmp_Sheet
component class U3_OpAmp_Sheet: C1_U3_OpAmp_Sheet C2_U3_OpAmp_Sheet C3_U3_OpAmp_Sheet C4_U3_OpAmp_Sheet C5_U3_OpAmp_Sheet C6_U3_OpAmp_Sheet D1_U3_OpAmp_Sheet D2_U3_OpAmp_Sheet LED1_U3_OpAmp_Sheet P1_U3_OpAmp_Sheet P2_U3_OpAmp_Sheet P3_U3_OpAmp_Sheet R1_U3_OpAmp_Sheet R2_U3_OpAmp_Sheet R3_U3_OpAmp_Sheet R4_U3_OpAmp_Sheet R5_U3_OpAmp_Sheet R6_U3_OpAmp_Sheet R7_U3_OpAmp_Sheet R8_U3_OpAmp_Sheet R9_U3_OpAmp_Sheet R10_U3_OpAmp_Sheet R11_U3_OpAmp_Sheet SB1_U3_OpAmp_Sheet SB2_U3_OpAmp_Sheet SB3_U3_OpAmp_Sheet SB4_U3_OpAmp_Sheet SB5_U3_OpAmp_Sheet SB6_U3_OpAmp_Sheet SB7_U3_OpAmp_Sheet SB8_U3_OpAmp_Sheet U1_U3_OpAmp_Sheet U2_U3_OpAmp_Sheet
component class U2_OpAmp_Sheet: C1_U2_OpAmp_Sheet C2_U2_OpAmp_Sheet C3_U2_OpAmp_Sheet C4_U2_OpAmp_Sheet C5_U2_OpAmp_Sheet C6_U2_OpAmp_Sheet D1_U2_OpAmp_Sheet D2_U2_OpAmp_Sheet LED1_U2_OpAmp_Sheet P1_U2_OpAmp_Sheet P2_U2_OpAmp_Sheet P3_U2_OpAmp_Sheet R1_U2_OpAmp_Sheet R2_U2_OpAmp_Sheet R3_U2_OpAmp_Sheet R4_U2_OpAmp_Sheet R5_U2_OpAmp_Sheet R6_U2_OpAmp_Sheet R7_U2_OpAmp_Sheet R8_U2_OpAmp_Sheet R9_U2_OpAmp_Sheet R10_U2_OpAmp_Sheet R11_U2_OpAmp_Sheet SB1_U2_OpAmp_Sheet SB2_U2_OpAmp_Sheet SB3_U2_OpAmp_Sheet SB4_U2_OpAmp_Sheet SB5_U2_OpAmp_Sheet SB6_U2_OpAmp_Sheet SB7_U2_OpAmp_Sheet SB8_U2_OpAmp_Sheet U1_U2_OpAmp_Sheet U2_U2_OpAmp_Sheet
component class U1_OpAmp_Sheet: C1_U1_OpAmp_Sheet C2_U1_OpAmp_Sheet C3_U1_OpAmp_Sheet C4_U1_OpAmp_Sheet C5_U1_OpAmp_Sheet C6_U1_OpAmp_Sheet D1_U1_OpAmp_Sheet D2_U1_OpAmp_Sheet LED1_U1_OpAmp_Sheet P1_U1_OpAmp_Sheet P2_U1_OpAmp_Sheet P3_U1_OpAmp_Sheet R1_U1_OpAmp_Sheet R2_U1_OpAmp_Sheet R3_U1_OpAmp_Sheet R4_U1_OpAmp_Sheet R5_U1_OpAmp_Sheet R6_U1_OpAmp_Sheet R7_U1_OpAmp_Sheet R8_U1_OpAmp_Sheet R9_U1_OpAmp_Sheet R10_U1_OpAmp_Sheet R11_U1_OpAmp_Sheet SB1_U1_OpAmp_Sheet SB2_U1_OpAmp_Sheet SB3_U1_OpAmp_Sheet SB4_U1_OpAmp_Sheet SB5_U1_OpAmp_Sheet SB6_U1_OpAmp_Sheet SB7_U1_OpAmp_Sheet SB8_U1_OpAmp_Sheet U1_U1_OpAmp_Sheet U2_U1_OpAmp_Sheet
component class Main_Sheet: P#3

## Components (designator, comment, footprint, x,y, rotation, side; value= is the part's Value field where it differs from the comment)
C1_U1_OpAmp_Sheet "1uF" Cap-0402 22.021,-24.676 r0 bottom locked (schematic designator C1)
C1_U2_OpAmp_Sheet "1uF" Cap-0402 49.959,-24.625 r0 bottom locked (schematic designator C1)
C1_U3_OpAmp_Sheet "1uF" Cap-0402 96.68,-24.549 r0 bottom locked (schematic designator C1)
C1_U4_OpAmp_Sheet "1uF" Cap-0402 143.435,-24.447 r0 bottom locked (schematic designator C1)
C1_U5_OpAmp_Sheet "1uF" Cap-0402 161.096,-24.396 r0 bottom (schematic designator C1)
C1_U6_OpAmp_Sheet "1uF" Cap-0402 180.255,-24.371 r0 bottom locked (schematic designator C1)
C1_U7_OpAmp_Sheet "1uF" Cap-0402 197.254,-24.345 r0 bottom locked (schematic designator C1)
C1_U7_OpAmp_Sheet_1 "1uF" Cap-0402 197.254,-24.345 r0 bottom locked (schematic designator C1)
C1_U_OpAmp_Sheet "1uF" Cap-0402 7.569,-24.714 r0 bottom locked (schematic designator C1)
C2_U1_OpAmp_Sheet "0.1uF" Cap-0402 15.468,-10.071 r180 bottom locked (schematic designator C2)
C2_U2_OpAmp_Sheet "0.1uF" Cap-0402 43.405,-10.02 r180 bottom locked (schematic designator C2)
C2_U3_OpAmp_Sheet "0.1uF" Cap-0402 90.127,-9.944 r180 bottom (schematic designator C2)
C2_U4_OpAmp_Sheet "0.1uF" Cap-0402 136.882,-9.842 r180 bottom (schematic designator C2)
C2_U5_OpAmp_Sheet "0.1uF" Cap-0402 154.543,-9.791 r180 bottom locked (schematic designator C2)
C2_U6_OpAmp_Sheet "0.1uF" Cap-0402 173.702,-9.766 r180 bottom locked (schematic designator C2)
C2_U7_OpAmp_Sheet "0.1uF" Cap-0402 190.701,-9.74 r180 bottom locked (schematic designator C2)
C2_U7_OpAmp_Sheet_1 "0.1uF" Cap-0402 190.701,-9.74 r180 bottom locked (schematic designator C2)
C2_U_OpAmp_Sheet "0.1uF" Cap-0402 1.016,-10.109 r180 bottom locked (schematic designator C2)
C3_U1_OpAmp_Sheet "10nF" Cap-0402 13.766,-14.846 r90 bottom locked (schematic designator C3)
C3_U2_OpAmp_Sheet "10nF" Cap-0402 41.704,-14.795 r90 bottom locked (schematic designator C3)
C3_U3_OpAmp_Sheet "10nF" Cap-0402 88.425,-14.719 r90 bottom locked (schematic designator C3)
C3_U4_OpAmp_Sheet "10nF" Cap-0402 135.18,-14.617 r90 bottom (schematic designator C3)
C3_U5_OpAmp_Sheet "10nF" Cap-0402 152.841,-14.566 r90 bottom locked (schematic designator C3)
C3_U6_OpAmp_Sheet "10nF" Cap-0402 172,-14.541 r90 bottom locked (schematic designator C3)
C3_U7_OpAmp_Sheet "10nF" Cap-0402 188.999,-14.515 r90 bottom locked (schematic designator C3)
C3_U_OpAmp_Sheet "10nF" Cap-0402 -0.686,-14.884 r90 bottom locked (schematic designator C3)
C4_U1_OpAmp_Sheet "1uF" Cap-0402 23.52,-20.257 r270 bottom locked (schematic designator C4)
C4_U2_OpAmp_Sheet "1uF" Cap-0402 51.458,-20.206 r270 bottom locked (schematic designator C4)
C4_U3_OpAmp_Sheet "1uF" Cap-0402 98.179,-20.13 r270 bottom locked (schematic designator C4)
C4_U4_OpAmp_Sheet "1uF" Cap-0402 144.934,-20.028 r270 bottom (schematic designator C4)
C4_U5_OpAmp_Sheet "1uF" Cap-0402 162.595,-19.977 r270 bottom locked (schematic designator C4)
C4_U6_OpAmp_Sheet "1uF" Cap-0402 181.754,-19.952 r270 bottom locked (schematic designator C4)
C4_U7_OpAmp_Sheet "1uF" Cap-0402 198.753,-19.926 r270 bottom locked (schematic designator C4)
C4_U7_OpAmp_Sheet_1 "1uF" Cap-0402 198.753,-19.926 r270 bottom locked (schematic designator C4)
C4_U_OpAmp_Sheet "1uF" Cap-0402 9.068,-20.295 r270 bottom locked (schematic designator C4)
C5_U1_OpAmp_Sheet "0.1uF" Cap-0402 23.799,-10.681 r270 bottom locked (schematic designator C5)
C5_U2_OpAmp_Sheet "0.1uF" Cap-0402 51.737,-10.63 r270 bottom locked (schematic designator C5)
C5_U3_OpAmp_Sheet "0.1uF" Cap-0402 98.458,-10.554 r270 bottom locked (schematic designator C5)
C5_U4_OpAmp_Sheet "0.1uF" Cap-0402 145.213,-10.452 r270 bottom locked (schematic designator C5)
C5_U5_OpAmp_Sheet "0.1uF" Cap-0402 162.874,-10.401 r270 bottom (schematic designator C5)
C5_U6_OpAmp_Sheet "0.1uF" Cap-0402 182.033,-10.376 r270 bottom locked (schematic designator C5)
C5_U7_OpAmp_Sheet "0.1uF" Cap-0402 199.032,-10.35 r270 bottom locked (schematic designator C5)
C5_U7_OpAmp_Sheet_1 "0.1uF" Cap-0402 199.032,-10.35 r270 bottom locked (schematic designator C5)
C5_U_OpAmp_Sheet "0.1uF" Cap-0402 9.347,-10.719 r270 bottom locked (schematic designator C5)
C6_U1_OpAmp_Sheet "1uF" Cap-0402 21.436,-7.201 r0 bottom locked (schematic designator C6)
C6_U2_OpAmp_Sheet "1uF" Cap-0402 49.373,-7.15 r0 bottom locked (schematic designator C6)
C6_U3_OpAmp_Sheet "1uF" Cap-0402 96.095,-7.074 r0 bottom locked (schematic designator C6)
C6_U4_OpAmp_Sheet "1uF" Cap-0402 142.85,-6.972 r0 bottom locked (schematic designator C6)
C6_U5_OpAmp_Sheet "1uF" Cap-0402 160.511,-6.921 r0 bottom locked (schematic designator C6)
C6_U6_OpAmp_Sheet "1uF" Cap-0402 179.67,-6.896 r0 bottom locked (schematic designator C6)
C6_U7_OpAmp_Sheet "1uF" Cap-0402 196.669,-6.87 r0 bottom locked (schematic designator C6)
C6_U7_OpAmp_Sheet_1 "1uF" Cap-0402 196.669,-6.87 r0 bottom locked (schematic designator C6)
C6_U_OpAmp_Sheet "1uF" Cap-0402 6.984,-7.239 r0 bottom locked (schematic designator C6)
D1_U1_OpAmp_Sheet "1N4148WS-7-F" SOD-323 15.189,-16.777 r180 bottom locked (schematic designator D1)
D1_U2_OpAmp_Sheet "1N4148WS-7-F" SOD-323 43.126,-16.726 r180 bottom locked (schematic designator D1)
D1_U3_OpAmp_Sheet "1N4148WS-7-F" SOD-323 89.848,-16.65 r180 bottom locked (schematic designator D1)
D1_U4_OpAmp_Sheet "1N4148WS-7-F" SOD-323 136.603,-16.548 r180 bottom locked (schematic designator D1)
D1_U5_OpAmp_Sheet "1N4148WS-7-F" SOD-323 154.264,-16.497 r180 bottom locked (schematic designator D1)
D1_U6_OpAmp_Sheet "1N4148WS-7-F" SOD-323 173.423,-16.472 r180 bottom locked (schematic designator D1)
D1_U7_OpAmp_Sheet "1N4148WS-7-F" SOD-323 190.422,-16.446 r180 bottom locked (schematic designator D1)
D1_U_OpAmp_Sheet "1N4148WS-7-F" SOD-323 0.737,-16.815 r180 bottom locked (schematic designator D1)
D2_U1_OpAmp_Sheet "1N4148WS-7-F" SOD-323 18.973,-16.777 r180 bottom locked (schematic designator D2)
D2_U2_OpAmp_Sheet "1N4148WS-7-F" SOD-323 46.911,-16.726 r180 bottom locked (schematic designator D2)
D2_U3_OpAmp_Sheet "1N4148WS-7-F" SOD-323 93.632,-16.65 r180 bottom locked (schematic designator D2)
D2_U4_OpAmp_Sheet "1N4148WS-7-F" SOD-323 140.387,-16.548 r180 bottom locked (schematic designator D2)
D2_U5_OpAmp_Sheet "1N4148WS-7-F" SOD-323 158.048,-16.497 r180 bottom (schematic designator D2)
D2_U6_OpAmp_Sheet "1N4148WS-7-F" SOD-323 177.207,-16.472 r180 bottom locked (schematic designator D2)
D2_U7_OpAmp_Sheet "1N4148WS-7-F" SOD-323 194.206,-16.446 r180 bottom locked (schematic designator D2)
D2_U_OpAmp_Sheet "1N4148WS-7-F" SOD-323 4.521,-16.815 r180 bottom locked (schematic designator D2)
LED1_U1_OpAmp_Sheet "Orange" LED-0603 14.528,-3.62 r180 bottom (schematic designator LED1)
LED1_U2_OpAmp_Sheet "Orange" LED-0603 42.466,-3.569 r180 bottom locked (schematic designator LED1)
LED1_U3_OpAmp_Sheet "Orange" LED-0603 89.187,-3.493 r180 bottom (schematic designator LED1)
LED1_U4_OpAmp_Sheet "Orange" LED-0603 135.942,-3.391 r180 bottom locked (schematic designator LED1)
LED1_U5_OpAmp_Sheet "Orange" LED-0603 153.603,-3.34 r180 bottom (schematic designator LED1)
LED1_U6_OpAmp_Sheet "Orange" LED-0603 172.762,-3.315 r180 bottom locked (schematic designator LED1)
LED1_U7_OpAmp_Sheet "Orange" LED-0603 189.761,-3.289 r180 bottom locked (schematic designator LED1)
LED1_U7_OpAmp_Sheet_1 "Orange" LED-0603 189.761,-3.289 r180 bottom locked (schematic designator LED1)
LED1_U_OpAmp_Sheet "Orange" LED-0603 0.076,-3.658 r180 bottom locked (schematic designator LED1)
P1_U1_OpAmp_Sheet "Test Point" Test-point 17.5,-28.359 r90 bottom locked (schematic designator P1)
P1_U2_OpAmp_Sheet "Test Point" Test-point 45.438,-28.308 r90 bottom locked (schematic designator P1)
P1_U3_OpAmp_Sheet "Test Point" Test-point 92.159,-28.232 r90 bottom locked (schematic designator P1)
P1_U4_OpAmp_Sheet "Test Point" Test-point 138.914,-28.13 r90 bottom locked (schematic designator P1)
P1_U5_OpAmp_Sheet "Test Point" Test-point 156.575,-28.079 r90 bottom (schematic designator P1)
P1_U6_OpAmp_Sheet "Test Point" Test-point 175.734,-28.054 r90 bottom (schematic designator P1)
P1_U7_OpAmp_Sheet "Test Point" Test-point 192.733,-28.029 r90 bottom (schematic designator P1)
P1_U_OpAmp_Sheet "Test Point" Test-point 3.048,-28.397 r90 bottom locked (schematic designator P1)
P2_U1_OpAmp_Sheet "SEMG Sensor" sEMG-sensor 19.158,-13.541 r180 top locked (schematic designator P2)
P2_U2_OpAmp_Sheet "SEMG Sensor" sEMG-sensor 47.095,-13.503 r180 top locked (schematic designator P2)
P2_U3_OpAmp_Sheet "SEMG Sensor" sEMG-sensor 93.816,-13.414 r180 top locked (schematic designator P2)
P2_U4_OpAmp_Sheet "SEMG Sensor" sEMG-sensor 140.571,-13.313 r180 top locked (schematic designator P2)
P2_U4_OpAmp_Sheet_1 "SEMG Sensor" sEMG-sensor 140.571,-13.313 r180 top locked (schematic designator P2)
P2_U5_OpAmp_Sheet "SEMG Sensor" sEMG-sensor 158.232,-13.262 r180 top locked (schematic designator P2)
P2_U5_OpAmp_Sheet_1 "SEMG Sensor" sEMG-sensor 158.232,-13.262 r180 top locked (schematic designator P2)
P2_U6_OpAmp_Sheet "SEMG Sensor" sEMG-sensor 177.391,-13.237 r180 top locked (schematic designator P2)
P2_U6_OpAmp_Sheet_1 "SEMG Sensor" sEMG-sensor 177.391,-13.237 r180 top locked (schematic designator P2)
P2_U7_OpAmp_Sheet "SEMG Sensor" sEMG-sensor 194.39,-13.211 r180 top locked (schematic designator P2)
P2_U7_OpAmp_Sheet_1 "SEMG Sensor" sEMG-sensor 194.39,-13.211 r180 top locked (schematic designator P2)
P2_U_OpAmp_Sheet "SEMG Sensor" sEMG-sensor 4.705,-13.592 r180 top locked (schematic designator P2)
P3_U1_OpAmp_Sheet "Test Point" Test-point 22.529,0.626 r90 bottom locked (schematic designator P3)
P3_U2_OpAmp_Sheet "Test Point" Test-point 50.467,0.677 r90 bottom locked (schematic designator P3)
P3_U3_OpAmp_Sheet "Test Point" Test-point 97.188,0.753 r90 bottom (schematic designator P3)
P3_U4_OpAmp_Sheet "Test Point" Test-point 143.943,0.855 r90 bottom locked (schematic designator P3)
P3_U5_OpAmp_Sheet "Test Point" Test-point 161.604,0.905 r90 bottom (schematic designator P3)
P3_U6_OpAmp_Sheet "Test Point" Test-point 180.763,0.931 r90 bottom (schematic designator P3)
P3_U7_OpAmp_Sheet "Test Point" Test-point 197.762,0.956 r90 bottom (schematic designator P3)
P3_U_OpAmp_Sheet "Test Point" Test-point 8.077,0.588 r90 bottom (schematic designator P3)
P#3 "32 pin Ribbon Pads" "32 pin Ribbon Pads." 96.673,104.088 r180 bottom locked
R1_U1_OpAmp_Sheet "1K" Res-0402 13.614,-1.969 r270 bottom locked (schematic designator R1)
R1_U2_OpAmp_Sheet "1K" Res-0402 41.551,-1.918 r270 bottom locked (schematic designator R1)
R1_U3_OpAmp_Sheet "1K" Res-0402 88.273,-1.842 r270 bottom locked (schematic designator R1)
R1_U4_OpAmp_Sheet "1K" Res-0402 135.028,-1.74 r270 bottom locked (schematic designator R1)
R1_U5_OpAmp_Sheet "1K" Res-0402 152.689,-1.689 r270 bottom locked (schematic designator R1)
R1_U6_OpAmp_Sheet "1K" Res-0402 171.848,-1.664 r270 bottom locked (schematic designator R1)
R1_U7_OpAmp_Sheet "1K" Res-0402 188.847,-1.638 r270 bottom locked (schematic designator R1)
R1_U7_OpAmp_Sheet_1 "1K" Res-0402 188.847,-1.638 r270 bottom locked (schematic designator R1)
R1_U_OpAmp_Sheet "1K" Res-0402 -0.838,-2.007 r270 bottom locked (schematic designator R1)
R2_U1_OpAmp_Sheet "240R" Res-0402 15.087,-21.4 r270 bottom (schematic designator R2)
R2_U2_OpAmp_Sheet "240R" Res-0402 43.024,-21.349 r270 bottom locked (schematic designator R2)
R2_U3_OpAmp_Sheet "240R" Res-0402 89.746,-21.273 r270 bottom locked (schematic designator R2)
R2_U4_OpAmp_Sheet "240R" Res-0402 136.501,-21.171 r270 bottom locked (schematic designator R2)
R2_U5_OpAmp_Sheet "240R" Res-0402 154.162,-21.12 r270 bottom locked (schematic designator R2)
R2_U6_OpAmp_Sheet "240R" Res-0402 173.321,-21.095 r270 bottom locked (schematic designator R2)
R2_U7_OpAmp_Sheet "240R" Res-0402 190.32,-21.069 r270 bottom locked (schematic designator R2)
R2_U_OpAmp_Sheet "240R" Res-0402 0.635,-21.438 r270 bottom locked (schematic designator R2)
R3_U1_OpAmp_Sheet "150K" Res-0402 13.766,-11.113 r90 bottom (schematic designator R3)
R3_U2_OpAmp_Sheet "150K" Res-0402 41.704,-11.062 r90 bottom locked (schematic designator R3)
R3_U3_OpAmp_Sheet "150K" Res-0402 88.425,-10.986 r270 bottom locked (schematic designator R3)
R3_U4_OpAmp_Sheet "150K" Res-0402 135.18,-10.884 r270 bottom (schematic designator R3)
R3_U5_OpAmp_Sheet "150K" Res-0402 152.841,-10.833 r270 bottom locked (schematic designator R3)
R3_U6_OpAmp_Sheet "150K" Res-0402 172,-10.808 r270 bottom locked (schematic designator R3)
R3_U7_OpAmp_Sheet "150K" Res-0402 188.999,-10.782 r90 bottom (schematic designator R3)
R3_U_OpAmp_Sheet "150K" Res-0402 -0.686,-11.151 r270 bottom locked (schematic designator R3)
R4_U1_OpAmp_Sheet "150K" Res-0402 15.087,-12.078 r90 bottom locked (schematic designator R4)
R4_U2_OpAmp_Sheet "150K" Res-0402 43.025,-12.027 r90 bottom locked (schematic designator R4)
R4_U3_OpAmp_Sheet "150K" Res-0402 89.746,-11.951 r90 bottom locked (schematic designator R4)
R4_U4_OpAmp_Sheet "150K" Res-0402 136.501,-11.849 r90 bottom locked (schematic designator R4)
R4_U5_OpAmp_Sheet "150K" Res-0402 154.162,-11.798 r90 bottom locked (schematic designator R4)
R4_U6_OpAmp_Sheet "150K" Res-0402 173.321,-11.773 r90 bottom locked (schematic designator R4)
R4_U7_OpAmp_Sheet "150K" Res-0402 190.32,-11.747 r90 bottom locked (schematic designator R4)
R4_U7_OpAmp_Sheet_1 "150K" Res-0402 190.32,-11.747 r90 bottom locked (schematic designator R4)
R4_U_OpAmp_Sheet "150K" Res-0402 0.635,-12.116 r90 bottom locked (schematic designator R4)
R5_U1_OpAmp_Sheet "150K" Res-0402 13.766,-12.903 r270 bottom locked (schematic designator R5)
R5_U2_OpAmp_Sheet "150K" Res-0402 41.704,-12.852 r270 bottom locked (schematic designator R5)
R5_U3_OpAmp_Sheet "150K" Res-0402 88.425,-12.776 r270 bottom locked (schematic designator R5)
R5_U4_OpAmp_Sheet "150K" Res-0402 135.18,-12.674 r270 bottom (schematic designator R5)
R5_U5_OpAmp_Sheet "150K" Res-0402 152.841,-12.623 r270 bottom locked (schematic designator R5)
R5_U6_OpAmp_Sheet "150K" Res-0402 172,-12.598 r270 bottom locked (schematic designator R5)
R5_U7_OpAmp_Sheet "150K" Res-0402 188.999,-12.572 r270 bottom locked (schematic designator R5)
R5_U_OpAmp_Sheet "150K" Res-0402 -0.686,-12.941 r270 bottom locked (schematic designator R5)
R6_U1_OpAmp_Sheet "150K" Res-0402 18.033,-18.199 r0 bottom locked (schematic designator R6)
R6_U2_OpAmp_Sheet "150K" Res-0402 45.971,-18.148 r0 bottom locked (schematic designator R6)
R6_U3_OpAmp_Sheet "150K" Res-0402 92.692,-18.072 r0 bottom locked (schematic designator R6)
R6_U4_OpAmp_Sheet "150K" Res-0402 139.447,-17.97 r0 bottom locked (schematic designator R6)
R6_U5_OpAmp_Sheet "150K" Res-0402 157.108,-17.919 r0 bottom locked (schematic designator R6)
R6_U6_OpAmp_Sheet "150K" Res-0402 176.267,-17.894 r0 bottom locked (schematic designator R6)
R6_U7_OpAmp_Sheet "150K" Res-0402 193.266,-17.868 r0 bottom locked (schematic designator R6)
R6_U_OpAmp_Sheet "150K" Res-0402 3.581,-18.237 r0 bottom locked (schematic designator R6)
R7_U1_OpAmp_Sheet "150K" Res-0402 13.766,-9.335 r90 bottom locked (schematic designator R7)
R7_U2_OpAmp_Sheet "150K" Res-0402 41.704,-9.284 r90 bottom locked (schematic designator R7)
R7_U3_OpAmp_Sheet "150K" Res-0402 88.425,-9.208 r90 bottom (schematic designator R7)
R7_U4_OpAmp_Sheet "150K" Res-0402 135.18,-9.106 r90 bottom (schematic designator R7)
R7_U5_OpAmp_Sheet "150K" Res-0402 152.841,-9.055 r90 bottom (schematic designator R7)
R7_U6_OpAmp_Sheet "150K" Res-0402 172,-9.03 r90 bottom locked (schematic designator R7)
R7_U7_OpAmp_Sheet "150K" Res-0402 188.999,-9.004 r90 bottom locked (schematic designator R7)
R7_U7_OpAmp_Sheet_1 "150K" Res-0402 188.999,-9.004 r90 bottom locked (schematic designator R7)
R7_U_OpAmp_Sheet "150K" Res-0402 -0.686,-9.373 r90 bottom locked (schematic designator R7)
R8_U1_OpAmp_Sheet "80.6K" Res-0402 19.633,-7.226 r0 bottom locked (schematic designator R8)
R8_U2_OpAmp_Sheet "80.6K" Res-0402 47.57,-7.175 r0 bottom locked (schematic designator R8)
R8_U3_OpAmp_Sheet "80.6K" Res-0402 94.292,-7.099 r0 bottom locked (schematic designator R8)
R8_U4_OpAmp_Sheet "80.6K" Res-0402 141.047,-6.997 r0 bottom (schematic designator R8)
R8_U5_OpAmp_Sheet "80.6K" Res-0402 158.708,-6.946 r0 bottom locked (schematic designator R8)
R8_U6_OpAmp_Sheet "80.6K" Res-0402 177.867,-6.921 r180 bottom locked (schematic designator R8)
R8_U7_OpAmp_Sheet "80.6K" Res-0402 194.866,-6.895 r0 bottom locked (schematic designator R8)
R8_U7_OpAmp_Sheet_1 "80.6K" Res-0402 194.866,-6.895 r0 bottom locked (schematic designator R8)
R8_U_OpAmp_Sheet "80.6K" Res-0402 5.181,-7.264 r0 bottom locked (schematic designator R8)
R9_U1_OpAmp_Sheet "80.6K" Res-0402 17.766,-7.226 r180 bottom locked (schematic designator R9)
R9_U2_OpAmp_Sheet "80.6K" Res-0402 45.703,-7.175 r180 bottom locked (schematic designator R9)
R9_U3_OpAmp_Sheet "80.6K" Res-0402 92.425,-7.099 r180 bottom locked (schematic designator R9)
R9_U4_OpAmp_Sheet "80.6K" Res-0402 139.18,-6.997 r180 bottom (schematic designator R9)
R9_U5_OpAmp_Sheet "80.6K" Res-0402 156.841,-6.946 r180 bottom locked (schematic designator R9)
R9_U6_OpAmp_Sheet "80.6K" Res-0402 176,-6.921 r180 bottom locked (schematic designator R9)
R9_U7_OpAmp_Sheet "80.6K" Res-0402 192.999,-6.895 r180 bottom locked (schematic designator R9)
R9_U7_OpAmp_Sheet_1 "80.6K" Res-0402 192.999,-6.895 r180 bottom locked (schematic designator R9)
R9_U_OpAmp_Sheet "80.6K" Res-0402 3.314,-7.264 r180 bottom locked (schematic designator R9)
R10_U1_OpAmp_Sheet "TC33X-2-104E" TC33X-2-104E_ 21.977,-15.304 r0 bottom (schematic designator R10)
R10_U2_OpAmp_Sheet "TC33X-2-104E" TC33X-2-104E_ 49.915,-15.253 r0 bottom locked (schematic designator R10)
R10_U3_OpAmp_Sheet "TC33X-2-104E" TC33X-2-104E_ 96.636,-15.177 r0 bottom locked (schematic designator R10)
R10_U4_OpAmp_Sheet "TC33X-2-104E" TC33X-2-104E_ 143.391,-15.075 r0 bottom locked (schematic designator R10)
R10_U5_OpAmp_Sheet "TC33X-2-104E" TC33X-2-104E_ 161.052,-15.024 r0 bottom (schematic designator R10)
R10_U6_OpAmp_Sheet "TC33X-2-104E" TC33X-2-104E_ 180.211,-14.999 r0 bottom locked (schematic designator R10)
R10_U7_OpAmp_Sheet "TC33X-2-104E" TC33X-2-104E_ 197.21,-14.973 r0 bottom locked (schematic designator R10)
R10_U_OpAmp_Sheet "TC33X-2-104E" TC33X-2-104E_ 7.525,-15.342 r0 bottom locked (schematic designator R10)
R11_U1_OpAmp_Sheet "1K" Res-0402 23.177,-7.201 r180 bottom locked (schematic designator R11)
R11_U2_OpAmp_Sheet "1K" Res-0402 51.115,-7.15 r180 bottom locked (schematic designator R11)
R11_U3_OpAmp_Sheet "1K" Res-0402 97.836,-7.074 r180 bottom locked (schematic designator R11)
R11_U4_OpAmp_Sheet "1K" Res-0402 144.591,-6.972 r180 bottom locked (schematic designator R11)
R11_U5_OpAmp_Sheet "1K" Res-0402 162.252,-6.921 r180 bottom locked (schematic designator R11)
R11_U6_OpAmp_Sheet "1K" Res-0402 181.411,-6.896 r180 bottom locked (schematic designator R11)
R11_U7_OpAmp_Sheet "1K" Res-0402 198.41,-6.87 r180 bottom locked (schematic designator R11)
R11_U7_OpAmp_Sheet_1 "1K" Res-0402 198.41,-6.87 r180 bottom locked (schematic designator R11)
R11_U_OpAmp_Sheet "1K" Res-0402 8.725,-7.239 r180 bottom locked (schematic designator R11)
SB1_U1_OpAmp_Sheet "Solder Bridge 0402" "Solder Bridge 0402" 21.742,-27.115 r180 bottom (schematic designator SB1)
SB1_U2_OpAmp_Sheet "Solder Bridge 0402" "Solder Bridge 0402" 49.68,-27.064 r180 bottom locked (schematic designator SB1)
SB1_U3_OpAmp_Sheet "Solder Bridge 0402" "Solder Bridge 0402" 96.401,-26.988 r180 bottom locked (schematic designator SB1)
SB1_U4_OpAmp_Sheet "Solder Bridge 0402" "Solder Bridge 0402" 143.156,-26.886 r180 bottom locked (schematic designator SB1)
SB1_U5_OpAmp_Sheet "Solder Bridge 0402" "Solder Bridge 0402" 160.817,-26.835 r180 bottom (schematic designator SB1)
SB1_U6_OpAmp_Sheet "Solder Bridge 0402" "Solder Bridge 0402" 179.976,-26.81 r180 bottom locked (schematic designator SB1)
SB1_U7_OpAmp_Sheet "Solder Bridge 0402" "Solder Bridge 0402" 196.975,-26.784 r180 bottom locked (schematic designator SB1)
SB1_U7_OpAmp_Sheet_1 "Solder Bridge 0402" "Solder Bridge 0402" 196.975,-26.784 r180 bottom locked (schematic designator SB1)
SB1_U_OpAmp_Sheet "Solder Bridge 0402" "Solder Bridge 0402" 7.29,-27.153 r180 bottom locked (schematic designator SB1)
SB2_U1_OpAmp_Sheet "Solder Bridge 0402" "Solder Bridge 0402" 21.742,-25.832 r180 bottom locked (schematic designator SB2)
SB2_U2_OpAmp_Sheet "Solder Bridge 0402" "Solder Bridge 0402" 49.68,-25.781 r180 bottom locked (schematic designator SB2)
SB2_U3_OpAmp_Sheet "Solder Bridge 0402" "Solder Bridge 0402" 96.401,-25.705 r180 bottom locked (schematic designator SB2)
SB2_U4_OpAmp_Sheet "Solder Bridge 0402" "Solder Bridge 0402" 143.156,-25.603 r180 bottom (schematic designator SB2)
SB2_U5_OpAmp_Sheet "Solder Bridge 0402" "Solder Bridge 0402" 160.817,-25.552 r180 bottom (schematic designator SB2)
SB2_U6_OpAmp_Sheet "Solder Bridge 0402" "Solder Bridge 0402" 179.976,-25.527 r180 bottom locked (schematic designator SB2)
SB2_U7_OpAmp_Sheet "Solder Bridge 0402" "Solder Bridge 0402" 196.975,-25.501 r180 bottom locked (schematic designator SB2)
SB2_U7_OpAmp_Sheet_1 "Solder Bridge 0402" "Solder Bridge 0402" 196.975,-25.501 r180 bottom locked (schematic designator SB2)
SB2_U_OpAmp_Sheet "Solder Bridge 0402" "Solder Bridge 0402" 7.29,-25.87 r180 bottom locked (schematic designator SB2)
SB3_U1_OpAmp_Sheet "Solder Bridge 0402" "Solder Bridge 0402" 23.545,-2.731 r90 bottom locked (schematic designator SB3)
SB3_U2_OpAmp_Sheet "Solder Bridge 0402" "Solder Bridge 0402" 51.483,-2.68 r90 bottom locked (schematic designator SB3)
SB3_U3_OpAmp_Sheet "Solder Bridge 0402" "Solder Bridge 0402" 98.204,-2.604 r90 bottom locked (schematic designator SB3)
SB3_U4_OpAmp_Sheet "Solder Bridge 0402" "Solder Bridge 0402" 144.959,-2.502 r90 bottom (schematic designator SB3)
SB3_U5_OpAmp_Sheet "Solder Bridge 0402" "Solder Bridge 0402" 162.62,-2.451 r90 bottom locked (schematic designator SB3)
SB3_U6_OpAmp_Sheet "Solder Bridge 0402" "Solder Bridge 0402" 181.779,-2.426 r90 bottom locked (schematic designator SB3)
SB3_U7_OpAmp_Sheet "Solder Bridge 0402" "Solder Bridge 0402" 198.778,-2.4 r90 bottom locked (schematic designator SB3)
SB3_U7_OpAmp_Sheet_1 "Solder Bridge 0402" "Solder Bridge 0402" 198.778,-2.4 r90 bottom locked (schematic designator SB3)
SB3_U_OpAmp_Sheet "Solder Bridge 0402" "Solder Bridge 0402" 9.093,-2.769 r90 bottom locked (schematic designator SB3)
SB4_U1_OpAmp_Sheet "Solder Bridge 0402" "Solder Bridge 0402" 24.618,-2.721 r90 bottom locked (schematic designator SB4)
SB4_U2_OpAmp_Sheet "Solder Bridge 0402" "Solder Bridge 0402" 52.555,-2.67 r90 bottom locked (schematic designator SB4)
SB4_U3_OpAmp_Sheet "Solder Bridge 0402" "Solder Bridge 0402" 99.277,-2.594 r90 bottom (schematic designator SB4)
SB4_U4_OpAmp_Sheet "Solder Bridge 0402" "Solder Bridge 0402" 146.032,-2.492 r90 bottom locked (schematic designator SB4)
SB4_U5_OpAmp_Sheet "Solder Bridge 0402" "Solder Bridge 0402" 163.693,-2.441 r90 bottom (schematic designator SB4)
SB4_U6_OpAmp_Sheet "Solder Bridge 0402" "Solder Bridge 0402" 182.852,-2.416 r90 bottom locked (schematic designator SB4)
SB4_U7_OpAmp_Sheet "Solder Bridge 0402" "Solder Bridge 0402" 199.851,-2.39 r90 bottom locked (schematic designator SB4)
SB4_U7_OpAmp_Sheet_1 "Solder Bridge 0402" "Solder Bridge 0402" 199.851,-2.39 r90 bottom locked (schematic designator SB4)
SB4_U_OpAmp_Sheet "Solder Bridge 0402" "Solder Bridge 0402" 10.166,-2.759 r90 bottom locked (schematic designator SB4)
SB5_U1_OpAmp_Sheet "Solder Bridge 0402" "Solder Bridge 0402" 16.941,-14.973 r270 bottom locked (schematic designator SB5)
SB5_U2_OpAmp_Sheet "Solder Bridge 0402" "Solder Bridge 0402" 44.879,-14.922 r270 bottom locked (schematic designator SB5)
SB5_U3_OpAmp_Sheet "Solder Bridge 0402" "Solder Bridge 0402" 91.6,-14.846 r270 bottom locked (schematic designator SB5)
SB5_U4_OpAmp_Sheet "Solder Bridge 0402" "Solder Bridge 0402" 138.355,-14.744 r270 bottom (schematic designator SB5)
SB5_U5_OpAmp_Sheet "Solder Bridge 0402" "Solder Bridge 0402" 156.016,-14.693 r270 bottom locked (schematic designator SB5)
SB5_U6_OpAmp_Sheet "Solder Bridge 0402" "Solder Bridge 0402" 175.175,-14.668 r270 bottom locked (schematic designator SB5)
SB5_U7_OpAmp_Sheet "Solder Bridge 0402" "Solder Bridge 0402" 192.174,-14.642 r270 bottom locked (schematic designator SB5)
SB5_U7_OpAmp_Sheet_1 "Solder Bridge 0402" "Solder Bridge 0402" 192.174,-14.642 r270 bottom locked (schematic designator SB5)
SB5_U_OpAmp_Sheet "Solder Bridge 0402" "Solder Bridge 0402" 2.489,-15.011 r270 bottom locked (schematic designator SB5)
SB6_U1_OpAmp_Sheet "Solder Bridge 0402" "Solder Bridge 0402" 20.472,-13.602 r0 bottom locked (schematic designator SB6)
SB6_U2_OpAmp_Sheet "Solder Bridge 0402" "Solder Bridge 0402" 48.41,-13.551 r0 bottom locked (schematic designator SB6)
SB6_U3_OpAmp_Sheet "Solder Bridge 0402" "Solder Bridge 0402" 95.131,-13.475 r0 bottom locked (schematic designator SB6)
SB6_U4_OpAmp_Sheet "Solder Bridge 0402" "Solder Bridge 0402" 141.886,-13.373 r0 bottom (schematic designator SB6)
SB6_U5_OpAmp_Sheet "Solder Bridge 0402" "Solder Bridge 0402" 159.547,-13.322 r0 bottom locked (schematic designator SB6)
SB6_U6_OpAmp_Sheet "Solder Bridge 0402" "Solder Bridge 0402" 178.706,-13.297 r0 bottom locked (schematic designator SB6)
SB6_U7_OpAmp_Sheet "Solder Bridge 0402" "Solder Bridge 0402" 195.705,-13.271 r0 bottom locked (schematic designator SB6)
SB6_U7_OpAmp_Sheet_1 "Solder Bridge 0402" "Solder Bridge 0402" 195.705,-13.271 r0 bottom locked (schematic designator SB6)
SB6_U_OpAmp_Sheet "Solder Bridge 0402" "Solder Bridge 0402" 6.02,-13.64 r0 bottom locked (schematic designator SB6)
SB7_U1_OpAmp_Sheet "Solder Bridge 0402" "Solder Bridge 0402" 24.206,-0.825 r90 bottom locked (schematic designator SB7)
SB7_U2_OpAmp_Sheet "Solder Bridge 0402" "Solder Bridge 0402" 52.143,-0.774 r270 bottom locked (schematic designator SB7)
SB7_U3_OpAmp_Sheet "Solder Bridge 0402" "Solder Bridge 0402" 98.865,-0.698 r90 bottom locked (schematic designator SB7)
SB7_U4_OpAmp_Sheet "Solder Bridge 0402" "Solder Bridge 0402" 145.62,-0.597 r90 bottom locked (schematic designator SB7)
SB7_U5_OpAmp_Sheet "Solder Bridge 0402" "Solder Bridge 0402" 163.281,-0.546 r90 bottom locked (schematic designator SB7)
SB7_U6_OpAmp_Sheet "Solder Bridge 0402" "Solder Bridge 0402" 182.44,-0.52 r90 bottom locked (schematic designator SB7)
SB7_U7_OpAmp_Sheet "Solder Bridge 0402" "Solder Bridge 0402" 199.439,-0.495 r90 bottom locked (schematic designator SB7)
SB7_U7_OpAmp_Sheet_1 "Solder Bridge 0402" "Solder Bridge 0402" 199.439,-0.495 r90 bottom locked (schematic designator SB7)
SB7_U_OpAmp_Sheet "Solder Bridge 0402" "Solder Bridge 0402" 9.754,-0.864 r90 bottom locked (schematic designator SB7)
SB8_U1_OpAmp_Sheet "Solder Bridge 0402" "Solder Bridge 0402" 16.078,-6.167 r180 bottom locked (schematic designator SB8)
SB8_U2_OpAmp_Sheet "Solder Bridge 0402" "Solder Bridge 0402" 44.015,-6.116 r180 bottom locked (schematic designator SB8)
SB8_U3_OpAmp_Sheet "Solder Bridge 0402" "Solder Bridge 0402" 90.737,-6.04 r180 bottom locked (schematic designator SB8)
SB8_U4_OpAmp_Sheet "Solder Bridge 0402" "Solder Bridge 0402" 137.492,-5.938 r180 bottom locked (schematic designator SB8)
SB8_U5_OpAmp_Sheet "Solder Bridge 0402" "Solder Bridge 0402" 155.153,-5.887 r180 bottom locked (schematic designator SB8)
SB8_U6_OpAmp_Sheet "Solder Bridge 0402" "Solder Bridge 0402" 174.312,-5.862 r180 bottom locked (schematic designator SB8)
SB8_U7_OpAmp_Sheet "Solder Bridge 0402" "Solder Bridge 0402" 191.311,-5.836 r180 bottom locked (schematic designator SB8)
SB8_U7_OpAmp_Sheet_1 "Solder Bridge 0402" "Solder Bridge 0402" 191.311,-5.836 r180 bottom locked (schematic designator SB8)
SB8_U_OpAmp_Sheet "Solder Bridge 0402" "Solder Bridge 0402" 1.626,-6.205 r180 bottom (schematic designator SB8)
U1_U1_OpAmp_Sheet "AD8221ARZ-R7" SOIC-8 19.328,-21.577 r0 bottom locked (schematic designator U1)
U1_U2_OpAmp_Sheet "AD8221ARZ-R7" SOIC-8 47.266,-21.526 r0 bottom locked (schematic designator U1)
U1_U3_OpAmp_Sheet "AD8221ARZ-R7" SOIC-8 93.987,-21.45 r0 bottom locked (schematic designator U1)
U1_U4_OpAmp_Sheet "AD8221ARZ-R7" SOIC-8 140.742,-21.348 r0 bottom locked (schematic designator U1)
U1_U5_OpAmp_Sheet "AD8221ARZ-R7" SOIC-8 158.403,-21.297 r0 bottom locked (schematic designator U1)
U1_U6_OpAmp_Sheet "AD8221ARZ-R7" SOIC-8 177.562,-21.272 r0 bottom locked (schematic designator U1)
U1_U7_OpAmp_Sheet "AD8221ARZ-R7" SOIC-8 194.561,-21.246 r0 bottom locked (schematic designator U1)
U1_U_OpAmp_Sheet "AD8221ARZ-R7" SOIC-8 4.876,-21.615 r0 bottom locked (schematic designator U1)
U2_U1_OpAmp_Sheet "TL084CPWR" 14-TSSOP 19.836,-10.401 r0 bottom locked (schematic designator U2)
U2_U2_OpAmp_Sheet "TL084CPWR" 14-TSSOP 47.773,-10.35 r0 bottom locked (schematic designator U2)
U2_U3_OpAmp_Sheet "TL084CPWR" 14-TSSOP 94.495,-10.274 r0 bottom (schematic designator U2)